# Altium PCB Kasli-DIOT.PCBDOC (part 7 of 23)
Units mm, origin at the board's own origin, x right, y up, seen from the top; angles counter-clockwise.
Board outline 222.9 x 100 mm, 10 copper layers (TopLayer, Layer 2, Layer 3, Layer 4, Layer 5, Layer 6, Layer 7, layer 8, Layer 9, BottomLayer), stack 1.564 mm thick; 977 components, 900 nets, 4676 pads, 2725 vias.
Unrouted connection lines stored in the file: 17.
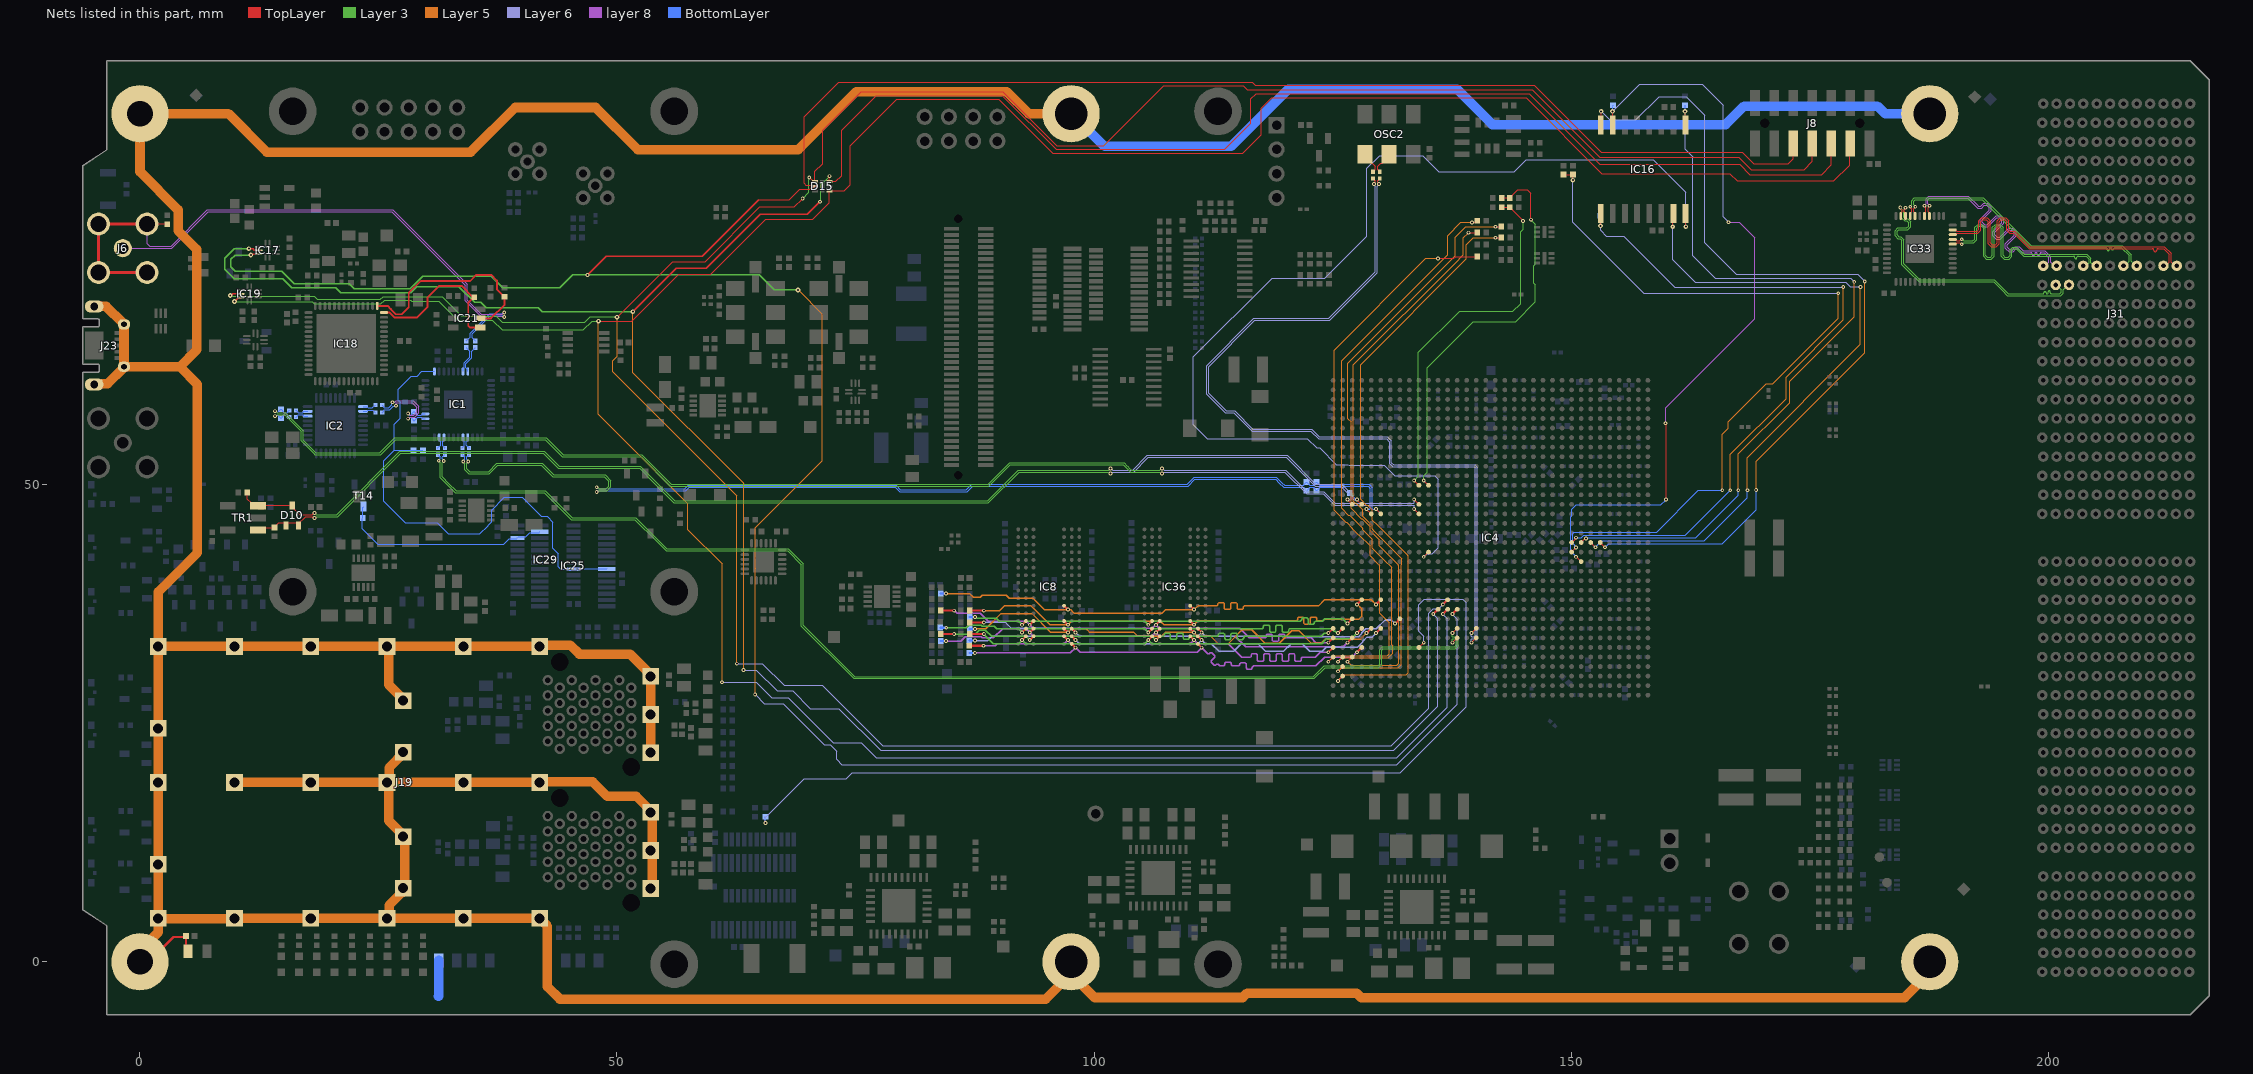
[diagram p13: the nets of this part, all layers, seen from the top]

## Via types
v1: diameter 0.4, hole 0.2, TopLayer to BottomLayer, tented both sides, 1723 vias
v2: diameter 0.5, hole 0.2, TopLayer to BottomLayer, tented both sides, 524 vias
v3: diameter 0.6, hole 0.3, TopLayer to BottomLayer, tented both sides, 172 vias
v4: diameter 0.6, hole 0.3, TopLayer to BottomLayer, 113 vias
v5: diameter 0.5, hole 0.2, TopLayer to BottomLayer, 107 vias
v6: diameter 0.4, hole 0.2, TopLayer to BottomLayer, 67 vias
v7: diameter 0.5, hole 0.25, TopLayer to BottomLayer, tented both sides, 12 vias
v8: diameter 0.8, hole 0.5, TopLayer to BottomLayer, tented both sides, 7 vias

## Nets (pads, with @x,y where several pads share a name; then routed paths per layer and width w, separated by ;. In a path a pad name is that pad's centre, name@x,y a point inside that pad or via, vN(x,y) a via of type N, cw(c..) or ccw(c..) an arc to the next point about the centre after c; other vN are vias at no path point) (continued)
4_PE_CLK_N: IC33.9 J31.K5 | length 28.6
  TopLayer w0.095: v1(185.045,79.044) 185.045,78.961 184.922,78.839 184.922,78.608 185.061,78.469 IC33.9@185.061,78.175
  Layer 3 w0.075: v1(185.045,79.044) 185.045,79.001 184.881,78.837 184.881,78.143 184.881,78.046 185.062,77.865 185.29,77.865 185.589,77.565 185.589,77.035 185.29,76.736 184.354,76.736 184.173,76.555 184.173,76.192 184.354,76.011 184.582,76.011 184.881,75.711 184.881,75.15 184.881,73.171 185.492,72.561 186.576,71.477 194.375,71.477 195.402,70.45 195.834,70.018 199.167,70.018 199.457,70.018 ccw(c199.457,70.131) 199.569,70.131 199.569,70.149 cw(c199.682,70.149) 199.682,70.262 cw(c199.682,70.149) 199.794,70.149 199.794,70.131 ccw(c199.907,70.131) 199.907,70.018 ccw(c199.907,70.131) 200.019,70.131 200.019,70.214 cw(c200.132,70.214) 200.132,70.326 cw(c200.132,70.214) 200.244,70.214 200.244,70.131 ccw(c200.357,70.131) 200.357,70.018 200.619,70.018 201.242,70.018 201.399,70.175 201.399,70.452 200.901,70.95 J31.K5@200.8,70.95
4_PE_CLK_P: IC33.10 J31.J5 | length 28.6
  TopLayer w0.095: v1(184.518,79.05) 184.518,78.993 184.7,78.811 184.7,78.608 184.561,78.469 IC33.10@184.561,78.175
  Layer 3 w0.075: v1(184.518,79.05) 184.518,79.005 184.679,78.844 184.679,78.143 184.679,77.962 184.979,77.663 185.206,77.663 185.387,77.482 185.387,77.119 185.206,76.938 184.271,76.938 183.971,76.638 183.971,76.108 184.271,75.809 184.498,75.809 184.679,75.628 184.679,75.15 184.679,73.088 185.421,72.346 186.492,71.275 194.292,71.275 195.188,70.379 195.75,69.816 201.326,69.816 201.601,70.092 201.601,70.452 202.099,70.95 J31.J5@202.2,70.95
4SERVMOD: IC4.AK1 R274.1 | length 60.8
  TopLayer w0.127: v1(124.561,31.45) IC4.AK1@125.061,31.95 ; v1(136.061,73.725) 137.713,73.725 137.918,73.929 R274.1@140.192,73.928 R274.1@140.192,73.928
  Layer 5 w0.1: v1(124.561,31.45) 125.196,32.085 130.729,32.085 130.961,32.317 130.961,33.129 130.957,33.133 130.957,35.521 129.961,36.517 129.961,41.541 129.911,41.591 129.911,41.595 129.706,41.8 129.702,41.8 128.938,42.564 128.938,43.606 127.756,44.789 127.689,44.789 127.08,45.398 127.08,45.464 126.471,46.073 126.405,46.073 125.161,47.317 125.161,64.089 134.797,73.725 v1(136.061,73.725)
5_PE_CLK_N: IC33.42 J31.C6 | length 32.9
  TopLayer w0.095: IC33.42@190.011,76.225 190.305,76.225 190.444,76.364 192.448,76.364 192.652,76.364 192.968,76.68 192.968,77.586 193.155,77.772 193.527,77.772 193.713,77.586 193.713,75.272 194.03,74.956 194.586,74.956 194.902,75.272 194.902,77.586 195.089,77.772 195.461,77.772 195.647,77.586 195.647,76.68 195.964,76.364 196.408,76.364 196.433,76.364 198.047,74.75 210.6,74.75 210.942,74.75 cw(c210.942,74.603) 211.09,74.603 211.09,74.59 ccw(c211.237,74.59) 211.385,74.59 211.385,74.603 cw(c211.532,74.603) 211.532,74.75 211.887,74.75 212.107,74.75 212.689,74.168 212.689,73.511 212.689,73.34 212.298,72.95 J31.C6@212.1,72.95
5_PE_CLK_P: IC33.43 J31.B6 | length 32.9
  TopLayer w0.095: IC33.43@190.011,76.725 190.305,76.725 190.444,76.586 192.448,76.586 192.56,76.586 192.746,76.772 192.746,77.678 193.063,77.994 193.619,77.994 193.935,77.678 193.935,75.364 194.122,75.178 194.494,75.178 194.68,75.364 194.68,77.678 194.997,77.994 195.553,77.994 195.869,77.678 195.869,76.772 196.056,76.586 196.408,76.586 196.525,76.586 198.139,74.972 212.199,74.972 212.911,74.26 212.911,73.419 212.911,73.34 213.301,72.95 J31.B6@213.5,72.95
5SERVMOD: IC4.AM2 R275.1 | length 64
  TopLayer w0.127: v1(125.561,29.45) IC4.AM2@126.061,29.95 ; v1(142.081,75.9) 142.676,75.9 R275.1@142.685,75.909
  Layer 5 w0.1: v1(125.561,29.45) 126.184,30.073 132.717,30.073 132.938,30.294 132.938,42.54 132.911,42.567 132.911,42.595 129.706,45.8 129.678,45.8 129.184,46.294 129.184,47.36 128.689,47.855 128.556,47.855 127.938,48.473 127.938,62.607 139.003,73.672 139.003,75.176 139.728,75.9 v1(142.081,75.9)
6_PE_CLK_N: IC33.7 J31.F6 | length 28.8
  TopLayer w0.095: IC33.7@186.061,78.175 186.061,78.469 185.922,78.608 185.922,78.77 185.923,78.771 185.923,78.93 186.088,79.094 v1(186.088,79.15)
  Layer 3 w0.075: v1(186.088,79.15) 186.088,79.194 185.926,79.356 185.926,79.715 186.077,79.866 193.129,79.866 198.145,74.85 205.822,74.85 206.085,74.85 cw(c206.085,74.738) 206.197,74.738 206.197,74.664 ccw(c206.31,74.664) 206.31,74.552 ccw(c206.31,74.664) 206.422,74.664 206.422,74.738 cw(c206.535,74.738) 206.535,74.85 cw(c206.535,74.738) 206.647,74.738 ; 206.647,74.737 ccw(c206.76,74.737) 206.76,74.625 ccw(c206.76,74.737) 206.872,74.737 ; 206.872,74.738 cw(c206.985,74.738) 206.985,74.85 207.457,74.85 207.699,74.85 208.499,74.05 208.499,73.601 208.499,73.455 207.994,72.95 J31.F6@207.9,72.95
6_PE_CLK_P: IC33.8 J31.E6 | length 28.8
  TopLayer w0.095: IC33.8@185.561,78.175 185.561,78.469 185.7,78.608 185.7,78.862 185.701,78.863 185.701,78.942 185.561,79.082 v1(185.561,79.15)
  Layer 3 w0.075: v1(185.561,79.15) 185.561,79.194 185.724,79.356 185.724,79.798 185.993,80.068 193.213,80.068 198.229,75.052 205.822,75.052 207.782,75.052 208.701,74.134 208.701,73.517 208.701,73.455 209.206,72.95 J31.E6@209.3,72.95
6SERVMOD: IC4.AK2 R257.1 | length 61.3
  TopLayer w0.127: v1(125.561,31.45) IC4.AK2@126.061,31.95 ; v1(139.608,77.506) 140.021,77.506 R257.1@140.192,77.677
  Layer 5 w0.1: v1(125.561,31.45) 125.963,31.852 130.817,31.852 131.288,32.323 131.288,33.123 131.184,33.227 131.184,41.353 130.437,42.1 130.416,42.1 129.165,43.351 129.165,44.313 128.184,45.294 128.184,45.427 126.784,46.827 126.651,46.827 125.961,47.517 125.961,63 137.061,74.1 137.061,76.112 138.456,77.506 v1(139.608,77.506)
7_PE_CLK_N: IC33.40 J31.I6 | length 28
  TopLayer w0.095: IC33.40@190.011,75.225 190.305,75.225 190.444,75.364 190.653,75.364 190.753,75.364 190.905,75.212 v1(190.961,75.212)
  Layer 3 w0.075: v1(190.961,75.212) 191.005,75.212 191.167,75.374 192.033,75.374 192.213,75.374 192.513,75.674 192.513,76.901 192.694,77.082 193.056,77.082 193.238,76.901 193.238,73.966 193.537,73.666 194.067,73.666 194.367,73.966 194.367,76.901 194.548,77.082 194.91,77.082 195.092,76.901 195.092,73.966 195.391,73.666 195.921,73.666 196.221,73.966 196.221,74.542 196.402,74.723 196.658,74.723 197.433,73.948 197.483,73.948 202.431,73.948 202.694,73.948 cw(c202.694,73.836) 202.806,73.836 202.806,73.797 ccw(c202.919,73.797) 202.919,73.684 ccw(c202.919,73.797) 203.031,73.797 203.031,73.836 cw(c203.144,73.836) 203.144,73.948 203.6,73.948 204.001,73.948 204.299,73.65 204.299,73.445 204.299,73.299 203.949,72.95 J31.I6@203.7,72.95
7_PE_CLK_P: IC33.41 J31.H6 | length 28
  TopLayer w0.095: IC33.41@190.011,75.725 190.305,75.725 190.444,75.586 190.561,75.586 190.753,75.586 190.905,75.739 v1(190.961,75.739)
  Layer 3 w0.075: v1(190.961,75.739) 191.005,75.739 191.167,75.576 192.033,75.576 192.129,75.576 192.311,75.757 192.311,76.984 192.61,77.284 193.14,77.284 193.44,76.984 193.44,74.049 193.621,73.868 193.983,73.868 194.165,74.049 194.165,76.984 194.464,77.284 194.994,77.284 195.294,76.984 195.294,74.049 195.475,73.868 195.837,73.868 196.019,74.049 196.019,74.625 196.318,74.925 196.742,74.925 197.483,74.183 197.517,74.15 204.084,74.15 204.501,73.734 204.501,73.361 204.501,73.299 204.85,72.95 J31.H6@205.1,72.95
7SERVMOD: IC4.AK3 R146.1 | length 63.2
  TopLayer w0.1: v1(142.081,77.05) 142.642,77.05 R146.1@142.685,77.092
  TopLayer w0.127: v1(126.561,31.45) IC4.AK3@127.061,31.95
  Layer 5 w0.1: v1(126.561,31.45) 126.938,31.073 131.717,31.073 131.938,31.294 131.938,41.548 131.911,41.575 131.911,41.595 130.706,42.8 130.686,42.8 129.892,43.594 129.892,44.219 128.938,45.173 128.938,45.606 128.094,46.45 128.028,46.45 126.938,47.54 126.938,56.606 126.597,56.947 126.597,62.739 137.858,74 137.858,75.947 138.961,77.05 v1(142.081,77.05)
8_PE_CLK_N: IC33.4 J31.L6 | length 27.9
  TopLayer w0.095: IC33.4@187.561,78.175 187.561,78.469 187.422,78.608 187.422,79.05 187.575,79.203 v1(187.575,79.25)
  layer 8 w0.075: v1(187.575,79.25) 187.575,79.294 187.412,79.456 187.412,79.899 187.563,80.05 191.575,80.05 192.486,79.14 192.613,79.012 193.037,79.012 193.324,79.299 193.58,79.299 193.836,79.043 193.836,78.787 192.907,77.858 192.907,77.434 193.282,77.059 193.706,77.059 194.635,77.988 194.891,77.988 195.147,77.732 195.147,77.476 194.218,76.547 194.218,76.123 194.593,75.748 195.017,75.748 195.946,76.677 196.202,76.677 196.458,76.421 196.458,76.165 195.538,75.244 195.538,74.82 195.912,74.446 196.336,74.446 196.63,74.739 196.886,74.739 197.049,74.576 197.298,74.327 197.877,74.327 198.19,74.327 cw(c198.19,74.189) 198.327,74.189 198.327,74.169 ccw(c198.465,74.169) 198.602,74.169 198.602,74.189 cw(c198.74,74.189) 198.877,74.189 ccw(c199.015,74.189) 199.152,74.189 cw(c199.29,74.189) 199.29,74.327 199.584,74.327 199.594,74.317 200.099,73.812 200.099,73.311 199.738,72.95 J31.L6@199.5,72.95
8_PE_CLK_P: IC33.5 J31.K6 | length 27.9
  TopLayer w0.095: v1(187.048,79.25) 187.048,79.203 187.2,79.05 187.2,78.608 187.061,78.469 IC33.5@187.061,78.175
  layer 8 w0.075: v1(187.048,79.25) 187.048,79.294 187.21,79.456 187.21,79.982 187.48,80.252 191.659,80.252 192.628,79.283 192.697,79.214 192.953,79.214 193.24,79.501 193.664,79.501 194.038,79.127 194.038,78.703 193.109,77.774 193.109,77.518 193.366,77.261 193.622,77.261 194.551,78.19 194.975,78.19 195.349,77.816 195.349,77.392 194.42,76.463 194.42,76.207 194.677,75.95 194.933,75.95 195.862,76.879 196.286,76.879 196.66,76.505 196.66,76.081 195.74,75.16 195.74,74.904 195.996,74.648 196.252,74.648 196.546,74.941 196.97,74.941 197.192,74.719 197.382,74.529 199.668,74.529 200.301,73.896 200.301,73.311 200.662,72.95 J31.K6@200.9,72.95
8SERVMOD: IC4.AL2 R291.1 | length 61
  TopLayer w0.127: v1(125.561,30.45) IC4.AL2@126.061,30.95 ; v1(139.261,76.428) R291.1@140.192,76.428
  Layer 5 w0.1: v1(125.561,30.45) 125.957,30.846 131.882,30.846 132.184,31.148 132.184,41.606 132.25,41.672 132.25,42.266 129.211,45.305 129.211,45.341 129.184,45.368 129.184,45.727 128.184,46.727 128.184,47.36 127.594,47.95 127.528,47.95 127.184,48.294 127.184,62.573 137.858,73.247 138.714,74.103 138.714,75.881 v1(139.261,76.428)
\VUSB_PRESENT_N: IC25.27 IC29.10 R209.1 T14.3 | length 22.2
  BottomLayer w0.125: T14.3@23.436,47.725 23.363,47.652 23.363,46.522 23.283,46.442 23.283,45.4 24.919,43.763 38.124,43.763 38.719,44.358 39.49,44.358 IC29.10@39.558,44.425 39.685,44.552 40.423,44.552 40.869,44.997 41.83,44.997 IC25.27@41.908,45.075
ASSY_Variant0: IC4.M11 R171.1 R173.2 | length 42.2
  TopLayer w0.127: v1(134.561,50.45) IC4.M11@135.061,49.95 ; R171.1@142.736,80.068 R173.2@143.596,80.068 143.822,80.295 143.822,80.364 144.409,80.95 145.403,80.95 145.794,80.559 v6(145.794,77.789)
  Layer 3 w0.127: v1(134.561,50.45) 134.561,50.936 134.937,51.312 134.937,62.251 139.761,67.075 144.186,67.075 146.275,69.164 146.275,70.964 146.096,71.143 146.096,72.943 146.275,73.122 146.275,77.308 v6(145.794,77.789)
ASSY_Variant1: IC4.M10 R170.1 R172.2 | length 38.8
  TopLayer w0.127: v1(133.561,50.45) IC4.M10@134.061,49.95 ; R170.1@142.736,79.093 R172.2@143.596,79.093 143.596,79.073 144.88,77.789 144.88,77.784 144.976,77.689 v6(144.976,77.646)
  Layer 3 w0.127: v1(133.561,50.45) 134.011,50.9 134.011,63.875 138.336,68.2 143.911,68.2 144.711,69 144.711,76.501 144.976,76.767 v6(144.976,77.646)
CFG_CCLK: IC4.W11 IC16.16 | length 117
  TopLayer w0.095: v1(134.561,42.45) IC4.W11@135.061,42.95
  TopLayer w0.125: IC16.16@162.006,78.425 162.033,78.398 v2(162.033,77.056)
  Layer 6 w0.095: v1(134.561,42.45) 134.908,42.797 135.438,42.797 136.061,43.42 136.061,50.599 135.731,50.929 131.532,50.929 130.434,52.027 126.751,52.027 126.676,52.103 125.417,52.103 123.66,53.86 123.361,53.86 122.378,54.843 111.889,54.843 110.425,56.307 110.425,63.414 118.668,71.657 124.193,71.657 128.611,76.075 128.611,83.175 129.936,84.5 134.461,84.5 136.136,82.825 144.061,82.825 145.311,84.075 158.605,84.075 162.033,80.647 v2(162.033,77.056)
CFG_D02: IC4.V26 IC16.9 R96.1 | length 75.8
  TopLayer w0.095: IC4.V26@150.061,43.95 150.529,44.418 v1(150.529,44.455)
  TopLayer w0.125: v2(153.093,77.143) 153.093,78.402 IC16.9@153.116,78.425
  Layer 5 w0.095: v1(166.686,49.425) 166.686,53.193 172.536,59.043 172.536,61.298 178.536,67.298 v1(178.536,70.725)
  Layer 6 w0.095: v2(153.093,77.143) 153.093,76.674 153.692,76.075 155.511,76.075 160.861,70.725 v1(178.536,70.725)
  BottomLayer w0.095: v1(150.529,44.455) 151.047,44.455 151.323,44.731 161.992,44.731 v1(166.686,49.425) ; R96.1@153.061,78.18 153.093,78.148 v2(153.093,77.143)
CFG_D03: IC4.V27 IC16.1 R94.1 | length 81.6
  TopLayer w0.095: IC4.V27@151.061,43.95 151.494,44.383 v1(151.561,44.383)
  TopLayer w0.1: v2(161.961,89.15) 161.961,87.77 IC16.1@162.006,87.725
  Layer 5 w0.095: v1(167.536,49.425) 167.536,53.252 172.911,58.627 172.911,60.848 179.686,67.623 v1(179.686,71.275)
  Layer 6 w0.095: v2(161.961,89.15) 161.961,85.175 162.736,84.4 162.736,74 165.111,71.625 165.511,71.625 179.336,71.625 v1(179.686,71.275)
  BottomLayer w0.095: v1(151.561,44.383) 151.603,44.425 163.061,44.425 167.536,48.9 v1(167.536,49.425) ; v2(161.961,89.15) R94.1@161.961,89.805
CFG_DIN: IC4.V29 IC16.8 | length 93.1
  TopLayer w0.095: IC4.V29@153.061,43.95 v1(153.561,43.45)
  TopLayer w0.125: IC16.8@153.116,87.725 153.161,87.77 v2(153.161,89.15)
  Layer 5 w0.095: v1(169.411,49.45) 169.411,52.475 180.786,63.85 v1(180.786,71.325)
  Layer 6 w0.095: v2(153.161,89.15) 154.036,88.275 156.8,88.275 159.225,90.7 162.061,90.7 164.011,88.75 164.011,75.375 167.311,72.075 180.036,72.075 v1(180.786,71.325)
  BottomLayer w0.095: v1(153.561,43.45) 153.936,43.825 165.836,43.825 169.411,47.4 v1(169.411,49.45)
CFG_FCS: IC4.Y27 IC16.7 R95.1 | length 79.3
  TopLayer w0.095: v1(150.529,42.45) 150.561,42.45 IC4.Y27@151.061,41.95 ; v1(159.919,56.45) 159.919,56.447 159.963,56.403 v1(159.963,48.45)
  TopLayer w0.1: v2(154.361,89.15) 154.361,87.75 IC16.7@154.386,87.725
  Layer 6 w0.095: v2(154.361,89.15) 157.186,91.975 163.742,91.975 165.936,89.781 165.936,78.093 v1(166.51,77.518)
  layer 8 w0.095: v1(159.919,56.45) 159.919,58.057 169.268,67.406 169.268,75.887 167.637,77.518 v1@166.556,77.518
  BottomLayer w0.095: v1(150.529,42.45) 149.966,43.013 149.966,46.667 150.069,46.77 150.069,47.449 150.535,47.915 159.428,47.915 v1(159.963,48.45) ; v2(154.361,89.15) 154.361,89.563 R95.1@154.411,89.805
CFG_MOSI: IC4.V28 IC16.15 | length 71.5
  TopLayer w0.095: IC4.V28@152.061,43.95 v1(152.561,43.45)
  TopLayer w0.125: v2(160.661,77.05) 160.661,78.35 IC16.15@160.736,78.425
  Layer 5 w0.095: v1(168.486,49.425) 168.486,52.858 180.336,64.708 v1(180.336,70.75)
  Layer 6 w0.095: v2(160.661,77.05) 160.661,73.6 163.011,71.25 164.386,71.25 178.786,71.25 179.286,70.75 v1(180.336,70.75)
  BottomLayer w0.095: v1(152.561,43.45) 153.236,44.125 163.961,44.125 168.486,48.65 v1(168.486,49.425)
CFG_PUDC_B: IC4.W26 R42.1 R43.2 | length 82.8
  TopLayer w0.095: R42.1@149.194,82.525 R43.2@150.194,82.525 ; IC4.W26@150.061,42.95 v1(150.517,43.441) ; v2(150.193,81.929) R43.2@150.194,82.525 ; R43.2@150.194,82.525 R43.2@150.194,82.525
  Layer 5 w0.095: v1(165.861,49.425) 165.861,55.302 166.499,55.94 166.499,56.621 170.476,60.598 171.157,60.598 178.011,67.452 v1(178.011,70.075)
  Layer 6 w0.095: v2(150.193,81.929) 150.193,77.518 157.636,70.075 161.158,70.075 v1(178.011,70.075)
  BottomLayer w0.095: v1(150.517,43.441) 150.517,43.517 150.161,43.873 150.161,44.886 150.3,45.025 158.961,45.025 163.361,49.425 v1(165.861,49.425)
CFG_TCK: D15.3 IC4.AE12 IC17.4 J8.6 | length 333.5
  TopLayer w0.127: v1(72.275,82.35) 72.271,82.346 D15.3@72.271,81.8 72.945,81.8 73.541,82.397 73.541,87.155 77.186,90.8 90.375,90.8 96.025,85.15 113.703,85.15 116.447,87.894 116.447,89.471 116.44,89.478 116.44,89.862 116.447,89.869 116.447,90.451 116.984,90.988 145.648,90.988 153.036,83.6 167.661,83.6 168.736,82.525 176.288,82.525 177.286,83.523 J8.6@177.286,85.775
  TopLayer w0.15: v2(11.411,74.75) 11.424,74.737 11.849,74.737 11.999,74.587 IC17.4@12.471,74.587 ; v2(51.661,68.15) 56.207,72.696 59.358,72.696 65.012,78.35 69.948,78.35 v1(71.268,79.67)
  TopLayer w0.24: v1(135.561,36.45) IC4.AE12@136.061,36.95
  Layer 3 w0.127: v1(71.268,79.67) 71.37,79.772 71.37,81.445 v1(72.275,82.35)
  Layer 3 w0.15: v2(11.411,74.75) 9.886,74.75 8.886,73.75 8.886,72.597 9.895,71.587 14.974,71.587 15.892,70.669 20.542,70.669 21.061,70.15 28.383,70.15 29.008,70.775 33.436,70.775 35.092,69.119 35.723,69.119 36.292,68.55 41.747,68.55 42.161,68.136 51.647,68.136 v2(51.661,68.15)
  Layer 5 w0.127: v2(51.661,68.15) 51.661,61.75 63.272,50.139 63.272,30.573 v1(63.274,30.572)
  Layer 6 w0.127: v1(63.274,30.572) 64.614,30.572 66.786,28.4 68.4,28.4 70.25,26.55 73.259,26.55 77.634,22.175 131.436,22.175 136.036,26.775 136.036,35.975 v1(135.561,36.45)
CFG_TDI: D15.5 IC4.AE14 IC17.5 J8.10 | length 349.7
  TopLayer w0.127: 64.836,79.9 68.058,79.9 69.137,80.979 70.192,80.979 70.427,81.214 70.665,81.214 D15.5@70.751,81.3 70.586,81.3 70.461,81.425 69.808,81.425 69.636,81.597 69.636,88.6 73.236,92.2 116.598,92.2 116.893,91.905 146.156,91.905 153.183,84.878 167.936,84.878 169.138,83.675 172.775,83.675 173.286,84.186 J8.10@173.286,85.775
  TopLayer w0.15: v2@11.617,73.981 v2(11.617,74.086) 11.717,74.187 IC17.5@12.471,74.187 ; v1(46.911,72) 48.886,73.975 58.911,73.975 64.836,79.9
  TopLayer w0.24: v1(137.561,36.45) IC4.AE14@138.061,36.95
  Layer 3 w0.15: v2(11.617,74.086) 9.969,74.086 9.511,73.628 9.511,72.873 10.009,72.375 14.885,72.375 16.185,71.075 21.944,71.075 22.469,70.55 28.343,70.55 29.639,71.846 36.845,71.846 38.022,70.669 44.02,70.669 45.351,72 v1(46.911,72) 64.886,72 66.463,70.423 v2(68.986,70.423)
  Layer 5 w0.127: v1(64.486,28.025) 64.511,28.05 64.511,41.212 64.492,41.231 64.492,41.574 64.511,41.593 64.511,42.312 64.492,42.331 64.492,42.674 64.511,42.693 64.511,45.475 71.536,52.5 71.536,67.873 v2(68.986,70.423)
  Layer 6 w0.127: v1(64.486,28.025) 65.461,27.05 67.42,27.05 71.735,22.735 72.351,22.735 73.009,22.077 73.009,21.234 73.58,20.663 131.749,20.663 138.086,27 138.086,35.925 v1(137.561,36.45)
CFG_TDO: D15.4 IC4.AD13 IC19.4 J8.8 | length 325.4
  TopLayer w0.125: v2(50.011,67.575) 55.832,73.396 59.258,73.396 64.987,79.125 68.578,79.125 v1(69.462,80.009)
  TopLayer w0.127: v1(70.15,82.219) 70.172,82.219 70.5,81.892 70.5,81.887 70.586,81.8 D15.4@70.751,81.8 70.751,82.866 71.541,83.656 71.541,87.155 75.607,91.221 90.454,91.221 96.119,85.556 101.037,85.556 107.294,91.813 115.637,91.813 116.056,91.394 145.942,91.394 152.986,84.35 167.571,84.35 168.871,83.05 174.428,83.05 175.286,83.908 J8.8@175.286,85.775
  TopLayer w0.15: v2(9.461,69.85) 9.556,69.85 9.721,70.015 10.251,70.015 10.258,70.022 10.558,70.022 IC19.4@10.566,70.015
  TopLayer w0.24: v1(136.561,37.45) IC4.AD13@137.061,37.95
  Layer 3 w0.125: v2(9.461,69.85) 9.561,69.75 18.261,69.75 18.586,69.425 25.173,69.425 25.476,69.728 31.694,69.728 33.734,67.687 37.348,67.687 37.986,67.05 46.636,67.05 47.199,67.613 49.973,67.613 v2(50.011,67.575)
  Layer 3 w0.127: v1(69.462,80.009) 70.105,80.652 70.105,82.174 v1(70.15,82.219)
  Layer 5 w0.127: v2(50.011,67.575) 50.047,67.539 50.047,63.495 49.557,63.005 49.557,61.854 62.559,48.852 v1(62.559,31.25)
  Layer 6 w0.127: v1(62.559,31.25) 62.574,31.265 65.246,31.265 67.536,28.975 71.524,28.975 77.874,22.625 131.167,22.625 135.111,26.569 135.111,36.552 135.564,37.005 136.116,37.005 v1(136.561,37.45)
CFG_TMS: D15.1 IC4.AE13 IC19.5 J8.4 | length 333.2
  TopLayer w0.125: v2(48.061,67.15) 49.814,67.15 49.829,67.135 51.546,67.135 56.461,72.05 59.836,72.05 65.611,77.825 69.336,77.825
  TopLayer w0.127: 69.336,77.825 70.536,77.825 72.271,79.56 D15.1@72.271,80.8 73.842,80.8 74.467,81.425 74.467,85.556 79.316,90.405 90.011,90.405 95.666,84.75 115.6,84.75 117.54,86.69 117.54,89.482 118.608,90.55 119.01,90.55 145.286,90.55 153.211,82.625 166.661,82.625 167.436,81.85 177.548,81.85 179.198,83.5 179.198,85.687 J8.4@179.286,85.775
  TopLayer w0.15: v2(9.911,69.2) 10.326,69.615 IC19.5@10.566,69.615
  TopLayer w0.24: v1(136.561,36.45) IC4.AE13@137.061,36.95
  Layer 3 w0.125: v2(9.911,69.2) 18.061,69.2 18.286,68.975 25.246,68.975 25.636,69.365 28.371,69.365 28.508,69.228 31.312,69.228 33.291,67.249 36.937,67.249 37.959,66.227 46.465,66.227 47.388,67.15 v2(48.061,67.15)
  Layer 5 w0.127: v2(48.061,67.15) 48.061,57.375 57.436,48 57.436,45.3 61.011,41.725 v1(61.011,29.3)
  Layer 6 w0.127: v1(61.011,29.3) 64.586,29.3 66.211,27.675 67.926,27.675 72.65,22.95 75.627,22.95 77.177,21.4 131.736,21.4 137.036,26.7 137.036,35.975 v1(136.561,36.45)
CHASSIS: C396.1 J19.SHIELD J23.6 M1.1 M2.1 M3.1 M4.1 M5.1 M6.1 R68.1 R72.2 | length 669.2
  TopLayer w0.25: M1.1@0,0 0.907,0 3.503,2.596 C396.1@4.825,2.596 ; C396.1@4.825,2.69 4.825,1.325 R68.1@5.025,1.125
  Layer 5 w1: J23.6@-4.8,60.512 -4.697,60.616 -3.379,60.616 -1.8,62.194 -1.8,62.35 J23.6@-1.675,62.35 ; J23.6@-4.7,68.7 -3.55,68.7 -1.8,66.95 -1.8,66.85 -1.775,66.825 J23.6@-1.675,66.825 J23.6@-1.675,62.375 4.18,62.375 ; M1.1@0,0 0,1.186 1.9,3.086 J19.SHIELD@1.9,4.555 J19.SHIELD@1.9,10.225 J19.SHIELD@1.9,18.805 J19.SHIELD@1.9,24.475 ; J19.SHIELD@1.912,33.067 1.912,38.765 6.024,42.877 6.024,60.531 4.18,62.375 ; J19.SHIELD@1.924,24.499 J19.SHIELD@1.924,33.031 ; J19.SHIELD@2.061,33.055 J19.SHIELD@9.9,33.055 J19.SHIELD@17.9,33.055 J19.SHIELD@25.9,33.055 J19.SHIELD@26.061,33.055 ; J19.SHIELD@2.085,4.531 J19.SHIELD@10.037,4.531 ; J19.SHIELD@10.061,4.555 J19.SHIELD@17.9,4.555 J19.SHIELD@25.9,4.555 J19.SHIELD@26.061,4.555 ; J19.SHIELD@10.061,18.805 J19.SHIELD@17.9,18.805 J19.SHIELD@25.9,18.805 J19.SHIELD@26.061,18.805 ; J19.SHIELD@27.741,21.975 26.105,20.339 26.105,18.849 J19.SHIELD@26.061,18.805 ; J19.SHIELD@27.741,27.375 26.061,29.055 J19.SHIELD@26.061,33.055 ; J19.SHIELD@41.9,33.055 J19.SHIELD@33.9,33.055 J19.SHIELD@26.061,33.055 ; J19.SHIELD@42.061,33.055 42.186,33.18 45.122,33.18 46.052,32.25 51.366,32.25 J19.SHIELD@53.61,30.006 ; J19.SHIELD@53.53,21.925 J19.SHIELD@53.53,25.925 J19.SHIELD@53.53,29.925 ; J19.SHIELD@53.691,7.675 53.691,15.675 52.016,17.35 48.961,17.35 47.457,18.854 42.11,18.854 42.061,18.805 J19.SHIELD@41.9,18.805 J19.SHIELD@33.9,18.805 J19.SHIELD@26.061,18.805 ; M5.1@97.6,88.9 93.155,88.9 90.839,91.216 75.075,91.216 69,85.141 52.173,85.141 47.767,89.548 39.332,89.548 34.656,84.872 13.286,84.872 9.258,88.9 M2.1@0,88.9 0,82.825 4,78.825 4,76.63 5.943,74.687 5.943,64.137 4.18,62.375 ; M4.1@187.6,0 187.6,-1.116 184.966,-3.75 128,-3.75 127.525,-3.275 116.049,-3.275 115.582,-3.742 100.054,-3.742 97.989,-1.677 97.989,-0.389 M6.1@97.6,0 97.825,-0.225 97.825,-1.513 97.339,-1.513 94.937,-3.915 44.011,-3.915 42.707,-2.61 42.707,3.748 J19.SHIELD@41.9,4.555 J19.SHIELD@33.9,4.555 J19.SHIELD@26.061,4.555 ; J19.SHIELD@26.061,4.555 26.104,4.598 26.104,5.93 27.366,7.192 27.366,7.35 27.741,7.725 27.741,13.125 26.061,14.805 J19.SHIELD@26.061,18.805
  BottomLayer w1: M1.1@0,0 M1.1@1.353,0 ; 31.286,-3.6 31.311,-3.6 R72.2@31.311,0.15 ; M5.1@97.6,88.9 97.686,88.9 101.117,85.469 114.366,85.469 120.366,91.469 138.063,91.469 141.77,87.761 166.208,87.761 168.139,89.693 182.122,89.693 182.915,88.9 M3.1@187.6,88.9
CK_FPGAIO_N: C6.2 IC4.R5 R210.2 R211.2 | length 106.8
  TopLayer w0.095: v1(128.561,47.45) IC4.R5@129.061,46.95
  Layer 3 w0.075: v1(34.412,52.448) 34.412,52.404 34.249,52.242 34.249,51.687 34.561,51.375 36.536,51.375 37.413,52.252 42.145,52.252 43.358,51.039 48.758,51.039 49.363,50.434 49.363,49.789 48.969,49.395 48.078,49.395 47.929,49.246 v1(47.872,49.246)
  BottomLayer w0.095: v1(34.412,52.448) 34.412,52.504 34.259,52.656 34.259,52.917 34.315,52.973 34.346,52.973 34.498,53.125 C6.2@34.498,53.15 ; v1(47.872,49.246) 48.011,49.385 57.196,49.385 57.554,49.743 79.154,49.743 79.619,49.278 86.714,49.278 87.289,49.853 109.857,49.853 110.579,50.575 119.036,50.575 119.386,50.225 119.886,49.725 121.674,49.725 121.971,49.725 122.027,49.669 122.027,49.619 122.27,49.376 R211.2@122.29,49.376 122.31,49.376 122.552,49.619 122.552,49.669 122.608,49.725 123.013,49.725 123.068,49.669 123.068,49.619 123.311,49.376 R210.2@123.331,49.376 123.351,49.376 123.593,49.619 123.593,49.669 123.649,49.725 126.111,49.725 126.21,49.825 128.737,49.825 128.951,49.61 128.951,47.506 128.895,47.45 v1(128.561,47.45)
CK_FPGAIO_P: C4.2 IC4.R6 R1.2 R2.2 | length 106.9
  TopLayer w0.095: v1(129.561,47.45) IC4.R6@130.061,46.95
  Layer 3 w0.075: v1(33.885,52.448) 33.885,52.404 34.047,52.242 34.047,51.603 34.477,51.173 36.62,51.173 37.497,52.05 42.061,52.05 43.274,50.837 48.674,50.837 49.161,50.35 49.161,49.873 48.885,49.597 48.078,49.597 47.929,49.746 v1(47.872,49.746)
  BottomLayer w0.095: C4.2@33.798,53.15 33.798,53.125 33.951,52.973 33.981,52.973 34.037,52.917 34.037,52.656 33.885,52.504 v1(33.885,52.448) ; v1(47.872,49.746) 48.011,49.607 57.104,49.607 57.462,49.965 79.246,49.965 79.711,49.5 86.622,49.5 87.197,50.075 109.765,50.075 110.487,50.797 119.128,50.797 119.7,50.225 119.978,49.947 121.582,49.947 121.766,49.947 121.767,49.946 ; v1(129.561,47.45) 129.227,47.45 129.171,47.506 129.171,49.701 128.828,50.045 126.119,50.045 126.02,49.945 123.649,49.945 123.593,50 123.593,50.051 123.351,50.293 R2.2@123.331,50.293 123.311,50.293 123.068,50.051 123.068,50 123.013,49.945 122.608,49.945 122.552,50 122.552,50.051 122.31,50.293 R1.2@122.29,50.293 122.27,50.293 122.027,50.051 122.027,50 121.971,49.945 121.766,49.945 ; 121.766,49.945 121.767,49.946
CK_GTP_125_N: C237.1 OSC2.5 | length 2.6
  TopLayer w0.095: C237.1@129.959,82.8 129.959,82.825 129.807,82.977 129.772,82.977 129.716,83.033 129.716,83.406 130.033,83.722 130.205,83.722 130.933,84.45 OSC2.5@130.933,84.65
CK_GTP_125_P: C236.1 OSC2.4 | length 2.5
  TopLayer w0.095: OSC2.4@128.393,84.65 128.393,84.45 129.12,83.722 129.186,83.722 129.494,83.414 129.494,83.033 129.438,82.977 129.404,82.977 129.251,82.825 C236.1@129.251,82.8
CK_GTP_N: C11.2 IC4.AH14 | length 125.7
  TopLayer w0.095: v1(137.561,33.45) IC4.AH14@138.061,33.95
  Layer 3 w0.075: v1(31.839,52.511) 31.839,52.469 31.674,52.304 31.674,50.837 32.336,50.175 33.134,49.377 42.46,49.377 42.579,49.259 45.285,46.552 51.959,46.552 54.261,44.25 55.234,43.277 67.967,43.277 68.085,43.159 69.42,41.825 69.538,41.706 69.538,35.259 74.897,29.9 123,29.9 124.15,31.05 129.786,31.05 129.934,31.198 129.934,32.734 130.217,33.016 137.792,33.016 137.994,33.219 137.994,33.782 137.927,33.849 137.605,33.849 137.561,33.805 v1(137.561,33.45)
  BottomLayer w0.095: v1(31.839,52.511) 31.839,52.567 31.686,52.719 31.686,52.897 31.761,52.973 31.805,52.973 31.957,53.125 C11.2@31.957,53.15
CK_GTP_P: C8.2 IC4.AG14 | length 126.7
  TopLayer w0.095: v1(137.561,34.45) IC4.AG14@138.061,34.95
  Layer 3 w0.075: v1(31.312,52.522) 31.312,52.476 31.472,52.316 31.472,50.753 32.265,49.961 33.05,49.175 42.377,49.175 45.202,46.35 51.875,46.35 54.047,44.179 55.15,43.075 67.883,43.075 69.336,41.622 69.336,35.175 74.813,29.698 123.084,29.698 124.234,30.848 129.87,30.848 130.136,31.114 130.136,32.65 130.3,32.814 137.876,32.814 138.196,33.135 138.196,33.866 138.011,34.051 137.605,34.051 137.561,34.095 v1(137.561,34.45)
  BottomLayer w0.095: C8.2@31.232,53.15 31.232,53.125 31.385,52.973 31.409,52.973 31.464,52.917 31.464,52.73 31.312,52.578 v1(31.312,52.522)
CKC_GTP_125_N: C237.2 IC4.AH16 | length 87
  TopLayer w0.095: v1(129.869,81.525) 129.869,81.581 129.716,81.733 129.716,81.867 129.772,81.922 129.807,81.922 129.959,82.075 C237.2@129.959,82.1 ; v1(139.561,33.45) IC4.AH16@140.061,33.95
  Layer 6 w0.08: v1(129.869,81.525) 129.869,81.478 129.709,81.318 129.709,75.152 129.709,72.223 124.71,67.225 116.841,67.225 112.011,62.395 112.011,59.598 113.852,57.757 114.731,57.757 116.649,55.839 122.814,55.839 123.63,55.024 130.761,55.024 131.108,54.677 131.108,54.669 131.183,54.594 131.183,52.309 131.41,52.082 139.947,52.082 140.032,51.996 140.168,51.861 140.168,34.039 139.975,33.846 139.608,33.846 139.561,33.8 v1(139.561,33.45)
CKC_GTP_125_P: C236.2 IC4.AG16 | length 86.6
  TopLayer w0.095: C236.2@129.251,82.1 129.251,82.075 129.404,81.922 129.438,81.922 129.494,81.867 129.494,81.733 129.342,81.581 v1(129.342,81.525) ; v1(139.561,34.45) IC4.AG16@140.061,34.95
  Layer 6 w0.08: v1(129.342,81.525) 129.342,81.478 129.502,81.318 129.502,75.067 129.502,72.309 124.625,67.432 116.755,67.432 111.804,62.481 111.804,59.512 113.766,57.55 114.645,57.55 116.563,55.632 122.729,55.632 123.544,54.817 130.675,54.817 130.901,54.591 130.901,54.583 130.976,54.508 130.976,52.223 131.324,51.875 139.861,51.875 139.886,51.85 139.961,51.775 139.961,34.125 139.889,34.053 139.608,34.053 139.561,34.1 v1(139.561,34.45)
CKI_FPGAIO_N: C6.1 IC1.4 | length 1.3
  BottomLayer w0.095: IC1.4@34.361,54.978 34.361,54.684 34.222,54.545 34.222,54.151 34.498,53.875 C6.1@34.498,53.85
CKI_FPGAIO_P: C4.1 IC1.5 | length 1.3
  BottomLayer w0.095: C4.1@33.798,53.85 33.798,53.875 34,54.077 34,54.545 33.861,54.684 IC1.5@33.861,54.978
CKI_GTP_N: C11.1 IC1.9 | length 1.3
  BottomLayer w0.095: IC1.9@31.861,54.978 31.861,54.684 31.722,54.545 31.722,54.11 31.957,53.875 C11.1@31.957,53.85
CKI_GTP_P: C8.1 IC1.10 | length 1.3
  BottomLayer w0.095: C8.1@31.232,53.85 31.232,53.875 31.5,54.143 31.5,54.545 31.361,54.684 IC1.10@31.361,54.978
CKIN0_N: C2.2 IC2.17 | length 1.4
  BottomLayer w0.095: C2.2@16.351,57.791 16.376,57.791 16.529,57.639 16.529,57.615 16.584,57.559 16.795,57.559 16.796,57.56 17.05,57.56 17.189,57.699 IC2.17@17.583,57.699
CKIN0_P: C1.2 IC2.16 | length 1.4
  BottomLayer w0.095: C1.2@16.351,57.104 16.376,57.104 16.529,57.257 16.529,57.281 16.584,57.337 16.887,57.337 16.888,57.338 17.05,57.338 17.189,57.199 IC2.16@17.583,57.199
CKOUT_1_N: C10.2 IC1.15 R6.2 | length 8.3
  layer 8 w0.075: v1(26.826,58.285) 26.886,58.345 26.886,58.575 26.936,58.625 28.536,58.625 29.036,58.125 29.036,57.636 28.696,57.296 28.317,57.296 28.155,57.459 v1(28.111,57.459)
  BottomLayer w0.095: C10.2@25.386,57.575 25.411,57.575 25.564,57.727 25.564,57.796 25.619,57.851 26.177,57.851 26.571,58.246 26.787,58.246 v1(26.826,58.285) ; v1(28.111,57.459) 28.141,57.459 28.293,57.306 28.418,57.306 28.474,57.362 28.474,57.423 28.716,57.665 R6.2@28.736,57.665 28.756,57.665 29.132,57.289 29.361,57.289 29.478,57.289 29.617,57.428 IC1.15@29.911,57.428
CKOUT_1_P: C7.2 IC1.14 R6.1 | length 9
  layer 8 w0.075: v1(26.453,58.658) 26.513,58.718 26.743,58.718 26.852,58.827 28.62,58.827 29.238,58.209 29.238,57.552 28.78,57.094 28.317,57.094 28.155,56.932 v1(28.111,56.932)
  BottomLayer w0.095: C7.2@25.386,58.35 25.411,58.35 25.564,58.198 25.564,58.129 25.619,58.073 26.085,58.073 26.414,58.403 26.414,58.618 v1(26.453,58.658) ; v1(28.111,56.932) 28.141,56.932 28.293,57.084 28.418,57.084 28.474,57.028 28.474,56.968 28.716,56.725 R6.1@28.736,56.725 28.756,56.725 29.098,57.067 29.269,57.067 29.478,57.067 29.617,56.928 IC1.14@29.911,56.928
CKOUT_D_1_N: C10.1 IC2.29 | length 1.5
  BottomLayer w0.095: IC2.29@23.383,57.699 23.777,57.699 23.916,57.838 24.398,57.838 24.661,57.575 C10.1@24.686,57.575
CKOUT_D_1_P: C7.1 IC2.28 | length 1.5
  BottomLayer w0.095: IC2.28@23.383,58.199 23.777,58.199 23.916,58.06 24.371,58.06 24.661,58.35 C7.1@24.686,58.35
CLK: IC18.56 IC21.4 R203.1 | length 16.7
  TopLayer w0.2: IC18.56@25.576,68.058 26.178,68.058 26.706,67.53 28.991,67.53 30.148,68.687 30.148,69.644 31.354,70.85 33.711,70.85 R203.1@34.949,69.612 ; R203.1@34.981,69.58 R203.1@34.949,69.612 ; R203.1@35.036,69.68 35.016,69.68 R203.1@34.949,69.612 ; IC21.4@35.661,66.5 34.579,66.5 34.412,66.667 34.412,69.076 R203.1@34.949,69.612
CLK_IN_N: D10.1 D10.2 IC4.P3 R13.2 TR1.3 | length 125.9
  TopLayer w0.095: TR1.3@12.376,45.255 12.644,45.523 R13.2@14.082,45.523 14.569,46.011 15.078,46.011 15.306,45.783 D10.1@15.306,45.75 ; D10.1@15.306,45.816 15.533,46.044 16.379,46.044 D10.2@16.606,45.816 ; D10.2@16.606,45.75 D10.2@16.606,45.816 ; v1(18.286,46.51) 18.23,46.51 18.078,46.662 17.368,46.662 16.606,45.9 D10.2@16.606,45.816 ; v1(126.561,48.45) IC4.P3@127.061,47.95
  Layer 3 w0.075: v1(18.286,46.51) 18.33,46.51 18.492,46.672 20.708,46.672 27.336,53.3 42.286,53.3 43.863,51.723 52.367,51.723 53.805,50.285 55.968,48.123 88.934,48.123 92.148,51.337 101.53,51.337 101.692,51.175 v1(101.736,51.175)
  Layer 6 w0.08: v1(101.736,51.175) 101.783,51.175 101.943,51.334 104.145,51.334 105.686,52.875 120.149,52.875 123.167,49.856 125.865,49.856 126.957,48.764 126.957,48.497 126.911,48.45 v1(126.561,48.45)
CLK_IN_P: D10.3 IC4.P4 R9.2 R80.2 TR1.1 | length 128.4
  TopLayer w0.095: R80.2@11.256,49.197 11.256,48.507 11.598,48.165 11.598,48.128 11.638,48.088 12.083,48.088 TR1.1@12.376,47.795 ; TR1.1@12.826,47.712 12.963,47.85 D10.3@15.956,47.85 16.184,47.623 16.184,47.461 16.76,46.884 18.078,46.884 18.23,47.037 v1(18.286,47.037) ; v1(127.561,48.45) IC4.P4@128.061,47.95
  Layer 3 w0.075: v1(18.286,47.037) 18.33,47.037 18.492,46.874 20.625,46.874 27.252,53.502 42.37,53.502 43.946,51.925 52.451,51.925 54.091,50.285 56.051,48.325 88.85,48.325 92.064,51.539 101.53,51.539 101.692,51.701 v1(101.736,51.701)
  Layer 6 w0.08: v1(101.736,51.701) 101.783,51.701 101.943,51.541 104.06,51.541 105.6,53.082 120.234,53.082 123.253,50.063 125.951,50.063 127.164,48.85 127.164,48.497 127.211,48.45 v1(127.561,48.45)
  BottomLayer w0.095: R9.2@126.831,49.15 126.831,49.13 127.511,48.45 v1(127.561,48.45)
CLK_OUT_CON_N: C247.1 J6.2 R301.2 | length 69.7
  TopLayer w0.095: J6.2@0.74,77.34 2.72,77.34 R301.2@2.85,77.47
  TopLayer w0.3: J6.2@0.74,72.26 J6.2@-4.34,72.26 J6.2@-4.34,77.34 J6.2@0.74,77.34
  layer 8 w0.095: J6.2@0.74,77.386 0.74,75.283 1.024,74.999 3.253,74.999 7.074,78.82 26.479,78.82 34.294,71.005 34.294,69.371 35.792,67.873 37.978,67.873 v1(38.181,68.075)
  BottomLayer w0.095: C247.1@34.214,65.082 34.214,65.107 34.392,65.285 34.417,65.285 34.61,65.478 34.61,65.895 36.637,67.922 37.973,67.922 38.126,68.075 v1(38.181,68.075)
CLK_OUT_CON_P: C246.1 J6.1 | length 52.2
  layer 8 w0.095: J6.1@-1.796,74.804 3.334,74.804 7.155,78.625 26.398,78.625 34.099,70.924 34.099,69.29 35.711,67.678 37.996,67.678 38.099,67.575 v1(38.181,67.575)
  BottomLayer w0.095: C246.1@35.136,65.082 35.136,65.107 34.959,65.285 34.934,65.285 34.805,65.413 34.805,65.814 36.71,67.72 37.973,67.72 38.118,67.575 v1(38.181,67.575)
CLK_OUT_N: C247.2 IC1.29 | length 3
  BottomLayer w0.095: IC1.29@33.861,61.878 33.861,62.208 33.963,62.311 33.963,62.782 34.577,63.395 34.577,64.02 34.417,64.18 34.392,64.18 34.214,64.357 C247.2@34.214,64.382
CLK_OUT_P: C246.2 IC1.30 | length 3
  BottomLayer w0.095: IC1.30@34.361,61.878 34.361,62.098 34.229,62.23 34.214,62.23 34.158,62.285 34.158,62.701 34.772,63.314 34.772,64.018 34.934,64.18 34.959,64.18 35.136,64.357 C246.2@35.136,64.382
CLK_SEL: IC1.23 IC25.8 IC29.20 R242.1 R243.2 | length 52.3
  BottomLayer w0.125: R243.2@29.661,53.62 R242.1@28.661,53.62 26.631,53.62 ; IC1.23@30.861,61.878 29.538,61.878 29.06,61.4 28.436,61.4 27.061,60.025 27.061,58.842 27.255,58.648 27.255,56.994 26.631,56.37 26.631,53.62 ; IC29.20@44.874,41.174 44.12,41.174 43.866,41.428 43.866,42.77 43.261,43.375 43.261,46.091 42.667,46.685 42.061,46.685 40.06,48.686 38.207,48.686 36.865,47.344 36.865,46.106 36.498,45.74 36.498,45.733 35.616,44.85 32.286,44.85 31.138,45.998 27.817,45.998 25.535,48.28 25.535,52.524 26.631,53.62 ; IC29.20@45.458,41.175 IC25.8@48.908,41.175 IC25.8@48.986,41.253
CLKREC_N: C2.1 IC4.P10 R3.1 | length 130.3
  TopLayer w0.095: v1(133.561,48.45) IC4.P10@134.061,47.95
  Layer 3 w0.075: v1(14.161,57.718) 14.205,57.718 14.367,57.556 15.241,57.556 17.111,55.686 17.111,54.686 18.279,53.518 18.422,53.375 25.15,53.375 26.702,54.927 42.57,54.927 44.347,53.15 52.613,53.15 55.688,50.075 88.906,50.075 91.158,52.327 103.145,52.327 103.454,52.018 103.525,51.946 103.711,51.761 103.933,51.539 106.905,51.539 107.067,51.701 v1(107.111,51.701)
  Layer 6 w0.08: v1(107.111,51.701) 107.198,51.701 107.353,51.546 112.027,51.546 120.084,51.546 122.37,49.261 124.095,49.261 125.302,48.054 133.514,48.054 133.561,48.1 v1(133.561,48.45)
  BottomLayer w0.095: v1(14.161,57.718) 14.244,57.718 14.337,57.625 14.45,57.625 14.75,57.925 R3.1@14.77,57.925 14.79,57.925 15.032,57.682 15.032,57.621 15.095,57.559 15.418,57.559 15.473,57.615 15.473,57.639 15.626,57.791 C2.1@15.651,57.791
CLKREC_P: C1.1 IC4.R10 R3.2 | length 130.3
  TopLayer w0.095: v1(133.561,47.45) IC4.R10@134.061,46.95
  Layer 3 w0.075: v1(14.161,57.191) 14.205,57.191 14.367,57.354 15.157,57.354 15.461,57.05 15.604,56.907 16.909,55.602 16.909,54.602 16.968,54.543 18.22,53.291 18.338,53.173 25.234,53.173 26.786,54.725 42.486,54.725 44.263,52.948 52.529,52.948 55.604,49.873 88.99,49.873 91.242,52.125 103.061,52.125 103.509,51.677 103.849,51.337 106.905,51.337 107.067,51.175 v1(107.111,51.175)
  Layer 6 w0.08: v1(107.111,51.175) 107.198,51.175 107.362,51.339 112.112,51.339 118.898,51.339 119.999,51.339 122.285,49.054 124.009,49.054 125.216,47.847 133.514,47.847 133.561,47.8 v1(133.561,47.45)
  BottomLayer w0.095: v1(14.161,57.191) 14.244,57.191 14.338,57.286 14.449,57.286 14.75,56.985 R3.2@14.77,56.985 14.79,56.985 15.032,57.227 15.032,57.281 15.088,57.337 15.418,57.337 15.473,57.281 15.473,57.257 15.626,57.104 C1.1@15.651,57.104
Coaxpress_ret: IC4.AJ10 R175.1 | length 100.6
  TopLayer w0.127: IC4.AJ10@134.061,32.95 v1(134.561,33.45)
  Layer 6 w0.125: v1(65.56,14.547) 65.56,15.114 69.61,19.164 74.05,19.164 74.679,19.793 132.106,19.793 139.034,26.722 139.034,37.611 138.662,37.984 134.606,37.984 134.197,37.575
  Layer 6 w0.127: 134.197,37.575 134.061,37.439 134.061,34.648 134.561,34.148 v1(134.561,33.45)
  BottomLayer w0.125: v1(65.56,14.547) R175.1@65.56,15.19
CS: IC18.1 IC21.5 R204.1 | length 21.7
  TopLayer w0.2: IC18.1@24.876,68.758 25.953,68.758 26.302,68.409 ; 26.302,68.408 26.835,67.875 27.418,67.875 28.172,68.629 28.172,70.11 29.425,71.363 34.622,71.363 35.259,72 36.812,72 37.405,71.408 37.405,70.507 37.991,69.92 38.021,69.92 R204.1@38.211,69.73 38.211,68.875 36.786,67.45 IC21.5@35.661,67.45
DDR_A00: IC4.AH1 IC8.N3 IC36.N3 R101.1 | length 46
  TopLayer w0.22: R101.1@83.911,36.806 v1(85.342,36.806) v1@85.411,36.806 ; v1(93.264,35.325) 93.664,35.725 IC8.N3@93.661,35.725 ; v1@106.489,35.325 106.889,35.725 IC36.N3@106.886,35.725 ; v1(124.561,33.45) IC4.AH1@125.061,33.95
  layer 8 w0.15: v1@85.411,36.806 85.687,36.53 88.069,36.53 88.897,35.702 92.887,35.702 v1(93.264,35.325) 93.641,34.948 106.112,34.948 v1(106.489,35.325) 106.863,34.951 115.26,34.951 116.257,33.954 117.861,33.954 117.936,33.954 118.035,34.053 118.035,34.229 118.133,34.327 118.594,34.327 118.693,34.229 118.693,33.679 118.791,33.581 119.252,33.581 119.351,33.679 119.351,34.229 119.449,34.327 119.91,34.327 120.009,34.229 120.009,34.053 120.107,33.954 120.361,33.954 122.757,33.954 123.261,33.45 123.761,33.45 v1(124.561,33.45)
DDR_A01: IC4.AG5 IC8.P7 IC36.P7 R102.1 | length 48.7
  TopLayer w0.22: IC8.P7@96.861,34.925 96.861,34.928 v1(97.261,34.528) ; IC36.P7@110.086,34.925 110.086,34.928 v1(110.486,34.528) ; v1(128.561,34.45) IC4.AG5@129.061,34.95
  Layer 5 w0.16: v1(87.529,34.901) 87.535,34.907 88.661,34.907 90.259,36.505 91.821,36.505 91.851,36.475 91.861,36.475 91.891,36.505 93.494,36.505 95.471,34.528 v1(97.261,34.528) 97.643,34.91 99.176,34.91 99.525,34.561 104.148,34.561 104.564,34.145 107.078,34.145 107.461,34.528 v1(110.486,34.528) 110.906,34.108 112.258,34.108 113.043,33.323 114.042,33.323 115.522,34.803 116.525,34.803 117.935,33.393 119.421,33.393 120.725,34.697 121.479,34.697 122.797,33.38 123.748,33.38 124.202,33.834 127.945,33.834 v1@128.469,34.358
  BottomLayer w0.22: R102.1@86.951,34.901 v1(87.529,34.901)
DDR_A02: IC4.AH3 IC8.P3 IC36.P3 R103.1 | length 46.4
  TopLayer w0.22: v1(93.264,34.525) 93.664,34.925 IC8.P3@93.661,34.925 ; v1(106.489,34.525) 106.889,34.925 IC36.P3@106.886,34.925 ; v1(126.561,33.45) IC4.AH3@127.061,33.95
  layer 8 w0.15: v1(84.489,33.625) 86.036,33.625 86.488,34.077 88.159,34.077 88.284,33.951 89.462,33.951 90.413,34.902 92.887,34.902 v1(93.264,34.525) 93.684,34.105 106.069,34.105 v1(106.489,34.525) 106.863,34.151 114.76,34.151 115.886,33.025 126.136,33.025 v1(126.561,33.45)
  BottomLayer w0.22: R103.1@83.911,33.625 v1(84.489,33.625)
DDR_A03: IC4.AF3 IC8.N2 IC36.N2 R104.1 | length 43.5
  TopLayer w0.22: v1(92.464,35.325) 92.864,35.725 IC8.N2@92.861,35.725 ; v1@105.689,35.325 106.089,35.725 IC36.N2@106.086,35.725 ; v1(126.561,35.45) IC4.AF3@127.061,35.95
  Layer 3 w0.15: v1(87.529,36.128) 87.597,36.128 87.708,36.018 89.739,36.018 90.055,35.702 92.087,35.702 v1(92.464,35.325) 92.844,35.705 105.309,35.705 v1(105.689,35.325) 106.069,35.705 112.936,35.705 115.761,35.705 121.568,35.705 121.643,35.705 121.774,35.836 121.774,35.919 121.906,36.051 122.301,36.051 122.432,35.919 122.432,35.49 122.564,35.359 122.959,35.359 123.09,35.49 123.09,35.573 123.222,35.705 123.495,35.705 123.949,35.705 124.194,35.95 126.061,35.95 v1(126.561,35.45)
  BottomLayer w0.22: R104.1@86.951,36.128 v1(87.529,36.128)
DDR_A04: IC4.AF8 IC8.P8 IC36.P8 R105.1 | length 48.3
  TopLayer w0.22: R105.1@86.951,35.58 v1(88.451,35.58) ; IC8.P8@97.661,34.925 97.661,34.928 v1(98.061,34.528) ; IC36.P8@110.886,34.925 110.886,34.928 v1(111.286,34.528) ; v1(131.561,35.45) IC4.AF8@132.061,35.95
  Layer 6 w0.16: v1(88.451,35.58) 90.725,35.58 91.361,34.943 97.646,34.943 v1(98.061,34.528) 98.414,34.175 98.676,34.175 98.706,34.145 110.903,34.145 v1(111.286,34.528) 111.706,34.108 119.726,34.108 119.764,34.07 127.718,34.07 128.061,34.413 128.061,34.487 128.477,34.904 129.59,34.904 130.516,35.83 131.181,35.83 v1(131.561,35.45)
DDR_A05: IC4.AG2 IC8.P2 IC36.P2 R106.1 | length 47
  TopLayer w0.22: v1(92.464,34.525) 92.864,34.925 IC8.P2@92.861,34.925 ; v1(105.689,34.525) 106.089,34.925 IC36.P2@106.086,34.925 ; v1(125.561,34.45) IC4.AG2@126.061,34.95
  Layer 3 w0.15: v1(84.515,35.02) 86.631,35.02 86.914,35.303 88.159,35.303 88.285,35.178 89.537,35.178 89.813,34.902 92.087,34.902 v1(92.464,34.525) 92.844,34.905 105.309,34.905 v1(105.689,34.525) 106.069,34.905 117.049,34.905 117.586,34.905 117.661,34.905 117.76,35.003 117.76,35.179 117.858,35.278 118.319,35.278 118.418,35.179 118.418,34.63 118.516,34.531 118.977,34.531 119.076,34.63 119.076,35.179 119.174,35.278 119.635,35.278 119.734,35.179 119.734,34.63 119.832,34.531 120.293,34.531 120.392,34.63 120.392,34.806 120.49,34.905 120.761,34.905 124.906,34.905 125.161,34.65 125.293,34.65 125.493,34.45 v1(125.561,34.45)
  BottomLayer w0.22: R106.1@83.937,35.02 v1(84.515,35.02)
DDR_A06: IC4.AG6 IC8.R8 IC36.R8 R107.1 | length 47.8
  TopLayer w0.22: IC8.R8@97.661,34.125 97.661,34.128 v1(98.061,33.728) ; IC36.R8@110.886,34.125 110.886,34.128 v1(111.286,33.728) ; v1(129.561,34.45) IC4.AG6@130.061,34.95
  Layer 6 w0.16: v1(87.522,33.675) 88.886,33.675 89.321,34.11 97.679,34.11 v1(98.061,33.728) 98.446,33.343 110.901,33.343 v1(111.286,33.728) 111.666,33.348 112.297,33.348 113.102,32.543 114.64,32.543 115.44,33.343 117.176,33.343 117.976,32.543 119.866,32.543 120.671,33.348 121.817,33.348 122.607,32.558 123.926,32.558 124.343,32.975 127.623,32.975 128.167,33.519 128.167,33.594 128.617,34.043 129.154,34.043 v1(129.561,34.45)
  BottomLayer w0.22: R107.1@86.944,33.675 v1(87.522,33.675)
DDR_A07: IC4.AG4 IC8.R2 IC36.R2 R108.1 | length 44
  TopLayer w0.22: R108.1@86.951,34.353 v1(88.451,34.353) ; v1(92.464,33.725) 92.864,34.125 IC8.R2@92.861,34.125 ; v1(105.689,33.725) 106.089,34.125 IC36.R2@106.086,34.125 ; v1(127.561,34.45) IC4.AG4@128.061,34.95
  Layer 3 w0.15: v1(88.451,34.353) 89.456,33.348 92.087,33.348 v1(92.464,33.725) 92.841,33.348 105.312,33.348 v1(105.689,33.725) 106.066,33.348 123.859,33.348 124.363,33.852 126.964,33.852 v1(127.561,34.45)
DDR_A08: IC4.AJ4 IC8.T8 IC36.T8 R109.1 | length 47.1
  TopLayer w0.22: IC8.T8@97.661,33.325 97.661,33.328 v1(98.061,32.928) ; IC36.T8@110.886,33.325 110.886,33.328 v1(111.286,32.928) ; v1(127.561,32.45) IC4.AJ4@128.061,32.95
  layer 8 w0.15: v1(87.509,32.38) 97.513,32.38 v1(98.061,32.928) 98.539,32.45 110.808,32.45 v1(111.286,32.928) 111.875,32.339 111.928,32.286 112.068,32.286 112.192,32.41 112.331,32.41 112.657,32.085 112.657,31.945 112.269,31.557 112.269,31.417 112.595,31.091 112.734,31.091 112.858,31.216 112.998,31.216 113.142,31.072 113.189,31.025 113.536,31.025 113.611,31.025 113.71,31.124 113.71,31.3 113.808,31.398 114.269,31.398 114.368,31.3 114.368,31.124 114.466,31.025 115.086,31.025 115.161,31.025 115.293,31.157 115.293,31.239 115.424,31.371 115.819,31.371 115.951,31.239 115.951,30.811 116.082,30.679 116.477,30.679 116.609,30.811 116.609,30.893 116.74,31.025 117.461,31.025 123.261,31.025 124.186,31.95 127.061,31.95 v1(127.561,32.45)
  BottomLayer w0.22: R109.1@86.931,32.38 v1(87.509,32.38)
DDR_A09: IC4.AG1 IC8.R3 IC36.R3 R110.1 | length 47.5
  TopLayer w0.22: R110.1@83.911,34.353 v1(85.342,34.353) v1@85.411,34.353 ; v1(93.264,33.725) 93.664,34.125 IC8.R3@93.661,34.125 ; v1(106.489,33.725) 106.889,34.125 IC36.R3@106.886,34.125 ; v1(124.561,34.45) IC4.AG1@125.061,34.95
  Layer 3 w0.15: v1@85.411,34.353 87.549,34.353 87.951,34.755 88.618,34.755 89.271,34.102 92.887,34.102 v1(93.264,33.725) 93.644,34.105 106.109,34.105 v1(106.489,33.725) 106.869,34.105 107.186,34.105 107.261,34.105 107.36,34.203 107.36,34.317 107.458,34.415 107.919,34.415 108.018,34.317 108.018,33.914 108.116,33.816 108.577,33.816 108.676,33.914 108.676,34.317 108.774,34.415 109.235,34.415 109.334,34.317 109.334,33.914 109.432,33.816 109.893,33.816 109.992,33.914 109.992,34.006 110.09,34.105 110.536,34.105 112.836,34.105 112.911,34.105 113.043,34.236 113.043,34.319 113.174,34.451 113.569,34.451 113.701,34.319 113.701,33.89 113.832,33.759 114.227,33.759 114.359,33.89 114.359,34.319 114.49,34.451 114.885,34.451 115.017,34.319 115.017,33.89 115.148,33.759 115.543,33.759 115.675,33.89 115.675,33.973 115.806,34.105 115.886,34.105 123.806,34.105 123.811,34.1 124.136,34.425 124.536,34.425 v1(124.561,34.45)
DDR_A10: IC4.AD6 IC8.L7 IC36.L7 R111.1 | length 51.6
  TopLayer w0.22: IC8.L7@96.861,37.325 96.861,37.328 v1(97.261,36.928) ; IC36.L7@110.086,37.325 110.086,37.328 v1(110.486,36.928) ; v1(129.561,37.45) IC4.AD6@130.061,37.95
  Layer 5 w0.16: v1(84.489,38.605) 86.931,38.605 87.334,38.202 88.082,38.202 88.294,38.413 90.802,38.413 91.106,38.109 93.614,38.109 94.796,36.928 v1(97.261,36.928) 97.587,36.928 97.681,36.834 97.681,36.77 97.906,36.545 107.13,36.545 107.513,36.928 v1(110.486,36.928) 110.868,37.31 112.811,37.31 112.891,37.31 112.991,37.41 112.991,37.55 113.091,37.65 113.559,37.65 113.659,37.55 113.659,37.037 113.759,36.936 114.227,36.936 114.327,37.037 114.327,37.55 114.427,37.65 114.895,37.65 114.995,37.55 114.995,37.037 115.095,36.936 115.563,36.936 115.663,37.037 115.663,37.21 115.763,37.31 116.061,37.31 123.521,37.31 124.161,37.95 129.061,37.95 v1(129.561,37.45)
  BottomLayer w0.22: R111.1@83.911,38.605 v1(84.489,38.605)
DDR_A11: IC4.AJ1 IC8.R7 IC36.R7 R112.1 | length 46
  TopLayer w0.22: R112.1@86.931,33.126 v1(88.431,33.126) ; IC8.R7@96.861,34.125 96.861,34.128 v1(97.261,33.728) ; IC36.R7@110.086,34.125 110.086,34.128 v1(110.486,33.728) ; v1(124.561,32.45) IC4.AJ1@125.061,32.95
  layer 8 w0.15: v1(88.431,33.126) 89.639,33.126 89.861,33.348 96.881,33.348 v1(97.261,33.728) 97.641,33.348 110.106,33.348 v1(110.486,33.728) 110.864,33.35 114.061,33.35 115.511,31.9 116.286,31.9 116.361,31.9 116.46,31.999 116.46,32.175 116.558,32.273 117.019,32.273 117.118,32.175 117.118,31.625 117.216,31.527 117.677,31.527 117.776,31.625 117.776,32.175 117.874,32.273 118.335,32.273 118.434,32.175 118.434,31.625 118.532,31.527 118.993,31.527 119.092,31.625 119.092,32.175 119.19,32.273 119.651,32.273 119.75,32.175 119.75,31.625 119.848,31.527 120.309,31.527 120.408,31.625 120.408,32.175 120.506,32.273 120.967,32.273 121.066,32.175 121.066,31.625 121.164,31.527 121.625,31.527 121.724,31.625 121.724,31.801 121.822,31.9 122.186,31.9 123.186,31.9 123.736,32.45 124.161,32.45 v1(124.561,32.45)
DDR_A12: IC4.AD4 IC8.N7 IC36.N7 R113.1 | length 47.9
  TopLayer w0.22: R113.1@86.951,36.806 v1(88.451,36.806) ; IC8.N7@96.861,35.725 96.861,35.728 v1(97.261,35.328) ; IC36.N7@110.086,35.725 110.086,35.728 v1(110.486,35.328) ; v1(127.561,37.45) IC4.AD4@128.061,37.95
  Layer 5 w0.16: v1(88.451,36.806) 90.105,36.806 90.603,37.305 93.423,37.305 95.401,35.328 v1(97.261,35.328) 97.643,35.71 106.949,35.71 107.331,35.328 v1(110.486,35.328) 110.904,35.746 121.156,35.746 121.236,35.746 121.336,35.846 121.336,36.019 121.436,36.119 121.904,36.119 122.004,36.019 122.004,35.473 122.104,35.372 122.572,35.372 122.672,35.473 122.672,36.019 122.772,36.119 123.24,36.119 123.34,36.019 123.34,35.846 123.44,35.746 123.761,35.746 124.032,35.746 124.211,35.925 127.786,35.925 128.061,36.2 128.061,37 127.611,37.45 v1(127.561,37.45)